# Altium PCB LED_Square.PcbDoc
Units mil, origin at the board's own origin, x right, y up, seen from the top; angles counter-clockwise.
Board outline 4566.93 x 314.96 mil, 2 copper layers (Top Layer, Bottom Layer), stack 57 mil thick; 17 components, 12 nets, 34 pads, 21 vias.
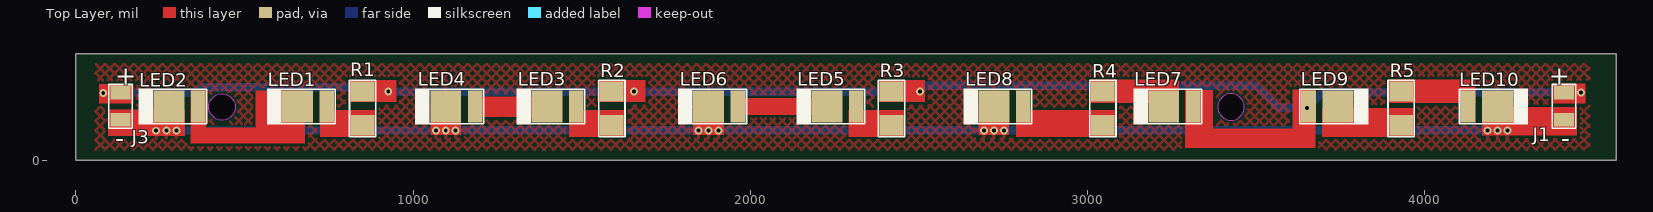
[diagram p0: Top Layer view]
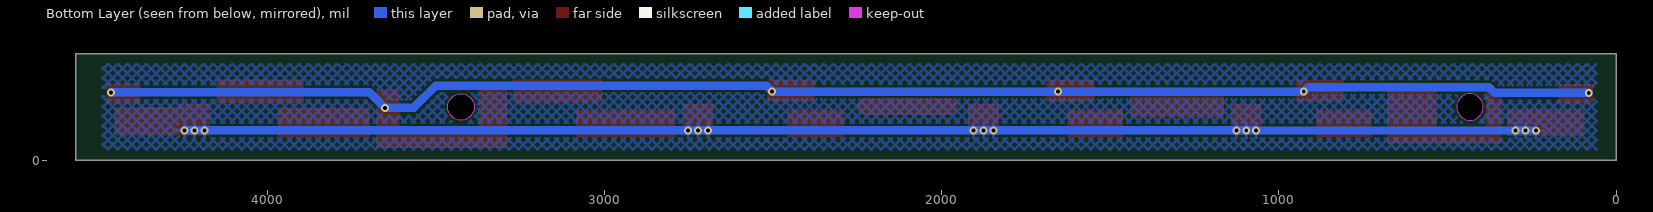
[diagram p1: Bottom Layer view, seen from below]

## Layer stack, top to bottom
Top Solder: solder mask 3, Solder Resist, Dk 3.5
Top Layer: signal copper 10
Dielectric 1: dielectric 37, FR-4, Dk 4.8
Bottom Layer: signal copper 10
Bottom Solder: solder mask 3, Solder Resist, Dk 3.5

## Board outline
0,0 0,314.96 4566.93,314.96 4566.93,0
cut-out: 3385.83,157.48 ccw(c3425.2,157.48) 3425.2,118.11 ccw(c3425.2,157.48) 3464.57,157.48 ccw(c3425.2,157.48) 3425.2,196.85 ccw(c3425.2,157.48)
cut-out: 433.07,118.11 cw(c433.07,157.48) 393.7,157.48 cw(c433.07,157.48) 433.07,196.85 cw(c433.07,157.48) 472.44,157.48 cw(c433.07,157.48)

## Design rules (kind name [scope] priority, off if disabled: settings)
Clearance [All] p1: gap=7 ignorepadtopadclearanceinfootprint=FALSE except(0: Arc-Hole Track-Hole SMDPad-Hole THPad-Hole Via-Hole Fill-Hole Poly-Hole Region-Hole Text-Hole)
ComponentClearance [All] p1: gap=0 collisioncheckmode=3 verticalgap=0 showdistances=FALSE
HoleSize [All] p1: absolutevalues=TRUE maxlimit=1000 minlimit=1 maxpercent=80.000 minpercent=20.000
HoleToHoleClearance [All] p1: gap=0 allowstackedmicrovias=TRUE
MinimumSolderMaskSliver [All] p1: minsoldermaskwidth=0
PolygonConnect [All] p1: connectstyle=Relief reliefconductorwidth=10 reliefentries=4 polygonreliefangle="90 Angle" airgapwidth=10
RoutingVias [All] p1: holewidth=11.81 width=23.62 viastyle="Through Hole" minholewidth=7.87 minwidth=17.72 maxholewidth=11.81 maxwidth=23.62
SilkToSilkClearance [All] p1: silktosilkclearance=0
SilkToSolderMaskClearance [IsPad] p1: minsilkscreentomaskgap=0 clearancetoexposedcopper=TRUE
SolderMaskExpansion SolderMaskExpansion_1 [Not IsVia] p1: expansion=4
SolderMaskExpansion [IsVia] p2: expansion=4 soldermaskfromhole=TRUE
Width [All] p1: maxlimit=100 minlimit=10 preferedwidth=10 minimp=50.000000 maximp=50.000000 favimp=50.000000
24 further rules are at their usual default settings.

## Components (designator, comment, footprint, x,y, rotation, side; value= is the part's Value field where it differs from the comment)
J1 "SMD PADS" "SMD PAD" 4412.26,159 r270 top locked
J3 "SMD PADS" "SMD PAD" 132.26,159 r270 top locked
LED1 "White LED" "White LED" 700.26,159 r180 top locked value=Custom
LED2 "White LED" "White LED" 319.26,159 r180 top value=Custom
LED3 "White LED" "White LED" 1440.26,159 r180 top locked value=Custom
LED4 "White LED" "White LED" 1140.26,159 r180 top locked value=Custom
LED5 "White LED" "White LED" 2270.26,159 r180 top locked value=Custom
LED6 "White LED" "White LED" 1919.26,159 r180 top locked value=Custom
LED7 "White LED" "White LED" 3269.26,159 r180 top locked value=Custom
LED8 "White LED" "White LED" 2765.26,159 r180 top locked value=Custom
LED9 "White LED" "White LED" 3698.26,159 r0 top locked value=Custom
LED10 "White LED" "White LED" 4171.26,159 r0 top locked value=Custom
R1 "5R1" Res1206 850.26,153 r90 top locked
R2 "5R1" Res1206 1589.26,153 r90 top locked
R3 "5R1" Res1206 2418.26,153 r90 top locked
R4 "5R1" Res1206 3045.26,153 r90 top locked
R5 "5R1" Res1206 3929.26,153 r270 top locked

## Footprints (in the part's own frame and the unit in brackets; to place one, negate y for a bottom-side part, rotate by r counter-clockwise, add the part's x,y. Pads: shape width x height; smd on the part's side, far side on the other; paste and mask are expansions set on the pad)
Res1206 [mil]
  rect 60x70 smd: 1(-50,0) 2(50,0)
  silkscreen extent -84,-39 84,39, body extent -63,-31 63,32, height 39
"SMD PAD" [mil] "SMD 0805"
  rect 40x60 smd: 1(-40,0) 2(40,0)
  silkscreen extent -65,-35 65,35
"White LED" [mm]
  rect 2.33x2.38 smd: 1(1.108,0)
  rect 1.1x2.38 smd: 2(-1.107,0)
  silkscreen extent -1.75,-1.35 3.4,1.35

## Part data
J1 J3: library part "SMD PAD"
LED1 LED2 LED3 LED4 LED5 LED6 LED7 LED8 LED9 LED10: library part HL-AM-2835H421W-S1-08-HR6(SDCM<6)(2800K-3100K)60mA, "White 2800K~3100K 2.8V~3.4V SMD,3.5x2.8x0.7mm Light Emitting Diodes (LED) RoHS", Manufacturer="HONGLITRONIC(Hongli Zhihui (HONGLITRONIC))", Package=Custom, ComponentLink1Description="Supplier Link", ComponentLink1URL=https://lcsc.com/product-detail/Light-Emitting-Diodes-LED_HONGLITRONIC-Hongli-Zhihui-HONGLITRONIC-HL-AM-2835H421W-S1-08-HR6-SDCM-6-2800K-3100K-60mA_C516131.html, Manufacturer Part No=HL-AM-2835H421W-S1-08-HR6(SDCM<6)(2800K-3100K)60mA
R1 R2 R3 R4 R5: library part 1206W4J051JT5E, "RES SMD 5.1O ±5% 0.25W 1206", Manufacturer="UNI-ROYAL(Uniroyal Elec)", Package=1206, Power(Watts)=0.25W, Resistance=5.1O, Temperature Coefficient=±400ppm/?, Tolerance=±5%

## Via types
v1: diameter 23.62, hole 11.81, Top Layer to Bottom Layer, tented both sides, 21 vias

## Nets (pads, with @x,y where several pads share a name; then routed paths per layer and width w, separated by ;. In a path a pad name is that pad's centre, name@x,y a point inside that pad or via, vN(x,y) a via of type N, cw(c..) or ccw(c..) an arc to the next point about the centre after c; other vN are vias at no path point)
GND: J1.2 J3.2 LED2.1 LED4.1 LED6.1 LED8.1 LED10.1 | length 4162.2
  Top Layer w25: J3.2 195.26,119 ; v1@263.26,84 v1@263.26,88
  Bottom Layer w25: v1(268.26,88) v1(297.76,88) v1(238.26,87) v1(1067.26,88) v1(1096.76,88) v1(1126.26,88) v1(1846.26,88) v1(1875.76,88) v1(1905.26,88) v1(2692.26,88) v1(2721.76,88) v1(2751.26,88) v1(4185.47,88) v1(4214.97,88) v1(4244.47,88)
LED_IN: J1.1 J3.1 LED7.2 LED9.2 R1.2 R2.2 R3.2 | length 4774.4
  Top Layer w25: v1(81.26,199) J3.1 ; R1.2 v1(926.26,203) ; R2.2 v1(1654.26,203) ; R3.2 v1(2502.26,203) ; J1.1 4414.26,201 v1(4462.26,201)
  Bottom Layer w25: v1(81.26,199) 360.26,199 377.62,216.35 912.91,216.35 v1(926.26,203) v1(1654.26,203) v1(2502.26,203) 2520.26,221 3499.26,221 3565.26,155 v1(3650.26,155) 3696.26,201 v1(4462.26,201)
NetLED1_1: LED1.1 LED2.2
NetLED1_2: LED1.2 R1.1
NetLED3_1: LED3.1 LED4.2
NetLED3_2: LED3.2 R2.1
NetLED5_1: LED5.1 LED6.2 | length 252.4
  Top Layer w50: LED6.2@1974.26,159 LED5.1
NetLED5_2: LED5.2 R3.1
NetLED7_1: LED7.1 R4.2
NetLED8_2: LED8.2 R4.1
NetLED9_1: LED9.1 R5.2
NetLED10_2: LED10.2 R5.1

## Polygon pours and split planes (outlines as drawn)
GND on Top Layer "GND_L01_P002" (hatched 45Degree grid 20 track 8, remove dead copper, pour order 2): 58.26,284 4487.26,284 4487.26,31 58.26,31
no net on Top Layer "Top Layer-No Net" (solid, pour order 0): 49.26,296
GND on Bottom Layer "GND_L02_P006" (hatched 45Degree grid 20 track 8, remove dead copper, pour order 6): 58.26,284 4487.26,284 4487.26,31 58.26,31

## Other copper
Top Layer:
  rectangle net NetLED1_1: 339.26,49 680.06,96
  rectangle net NetLED1_1: 533.26,49 680.06,206
  rectangle net NetLED1_1: 339.26,50 386.26,206
  rectangle net LED_IN: 3289.26,36 3675.26,93
  rectangle net LED_IN: 3607.26,36 3675.26,210
  rectangle net LED_IN: 3288.26,36 3372.26,208
  rectangle net NetLED3_1: 1163.26,127 1440.26,188
  region net LED_IN: 170.26,226 68.26,226 68.26,168 170.26,168
  rectangle net LED_IN: 808.26,172 950.26,238
  rectangle net LED_IN: 1547.26,172 1689.26,238
  rectangle net LED_IN: 4375.26,168 4476.26,227
  rectangle net LED_IN: 2376.26,172 2518.26,238
  rectangle net GND: 4169.47,74 4260.47,166
  rectangle net GND: 2676.26,74 2767.26,166
  rectangle net GND: 1830.26,74 1921.26,166
  rectangle net GND: 1051.26,74 1142.26,166
  region net NetLED7_1: 3271.26,239 3006.26,239 3006.26,169 3271.26,169
  region net NetLED10_2: 4149.26,239 3890.26,239 3890.26,169 4149.26,169
  rectangle net GND: 4169.26,73 4451.26,157
  rectangle net NetLED9_1: 3695.26,69 3968.26,155
  rectangle net NetLED8_2: 2787.26,69 3084.26,148
  rectangle net NetLED5_2: 2291.26,69 2457.26,148
  rectangle net NetLED1_2: 723.26,69 889.26,148
  rectangle net NetLED3_2: 1462.26,69 1628.26,148
  rectangle net GND: 95.26,71 324.26,150

## Silkscreen, mask and mechanical layers (free items; w line width, h text height)
Top Overlay:
  text "+" at 116.26,224 h55
  text "+" at 4431.08,224 h55
  text "-" at 116.26,38 h55
  text "-" at 4431.08,38 h55
Mechanical 2:
  circle w3.94: c433.07,157.48 r39.37
  circle w3.94: c3425.2,157.48 r39.37
  lines w3.94: 0,0 0,314.96 4566.93,314.96 4566.93,0 0,0

## Dimensions
444.55,195.34 to 3425.2,118.11 on Mechanical 1
472.44,157.48 to 393.7,157.48 on Mechanical 1
0,314.96 to 0,0 on Mechanical 1
0,314.96 to 4566.93,314.96 on Mechanical 1